# Altium PCB PCB1.PcbDoc
Units mm, origin at the board's own origin, x right, y up, seen from the top; angles counter-clockwise.
Board outline 58 x 55 mm, 4 copper layers (TOP01, GND02, PWR03, BOT04), stack 0.603 mm thick; 80 components, 56 nets, 296 pads, 189 vias.
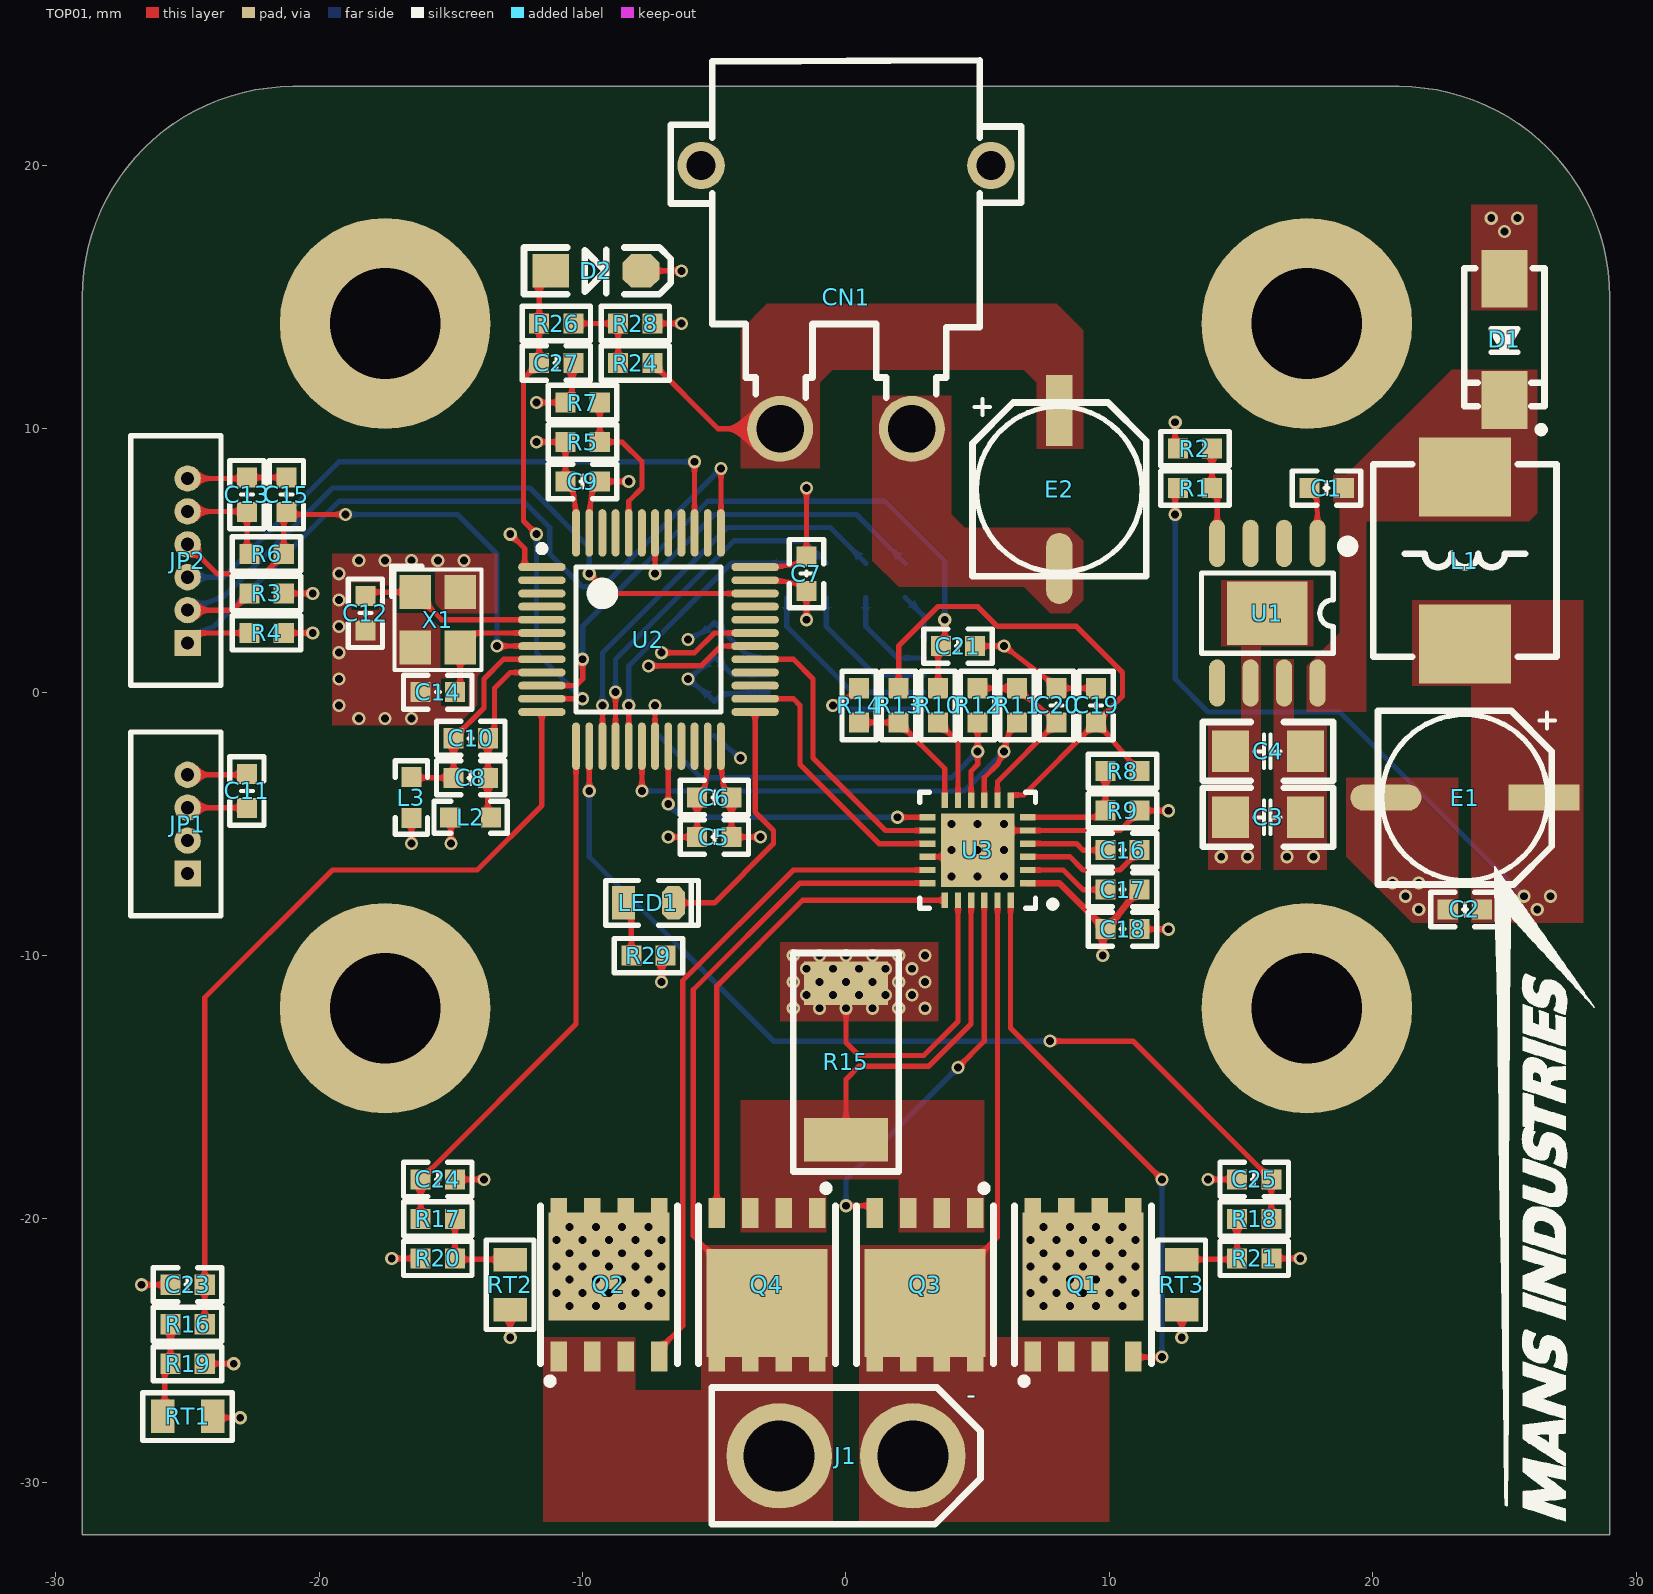
[diagram p0: TOP01 view]
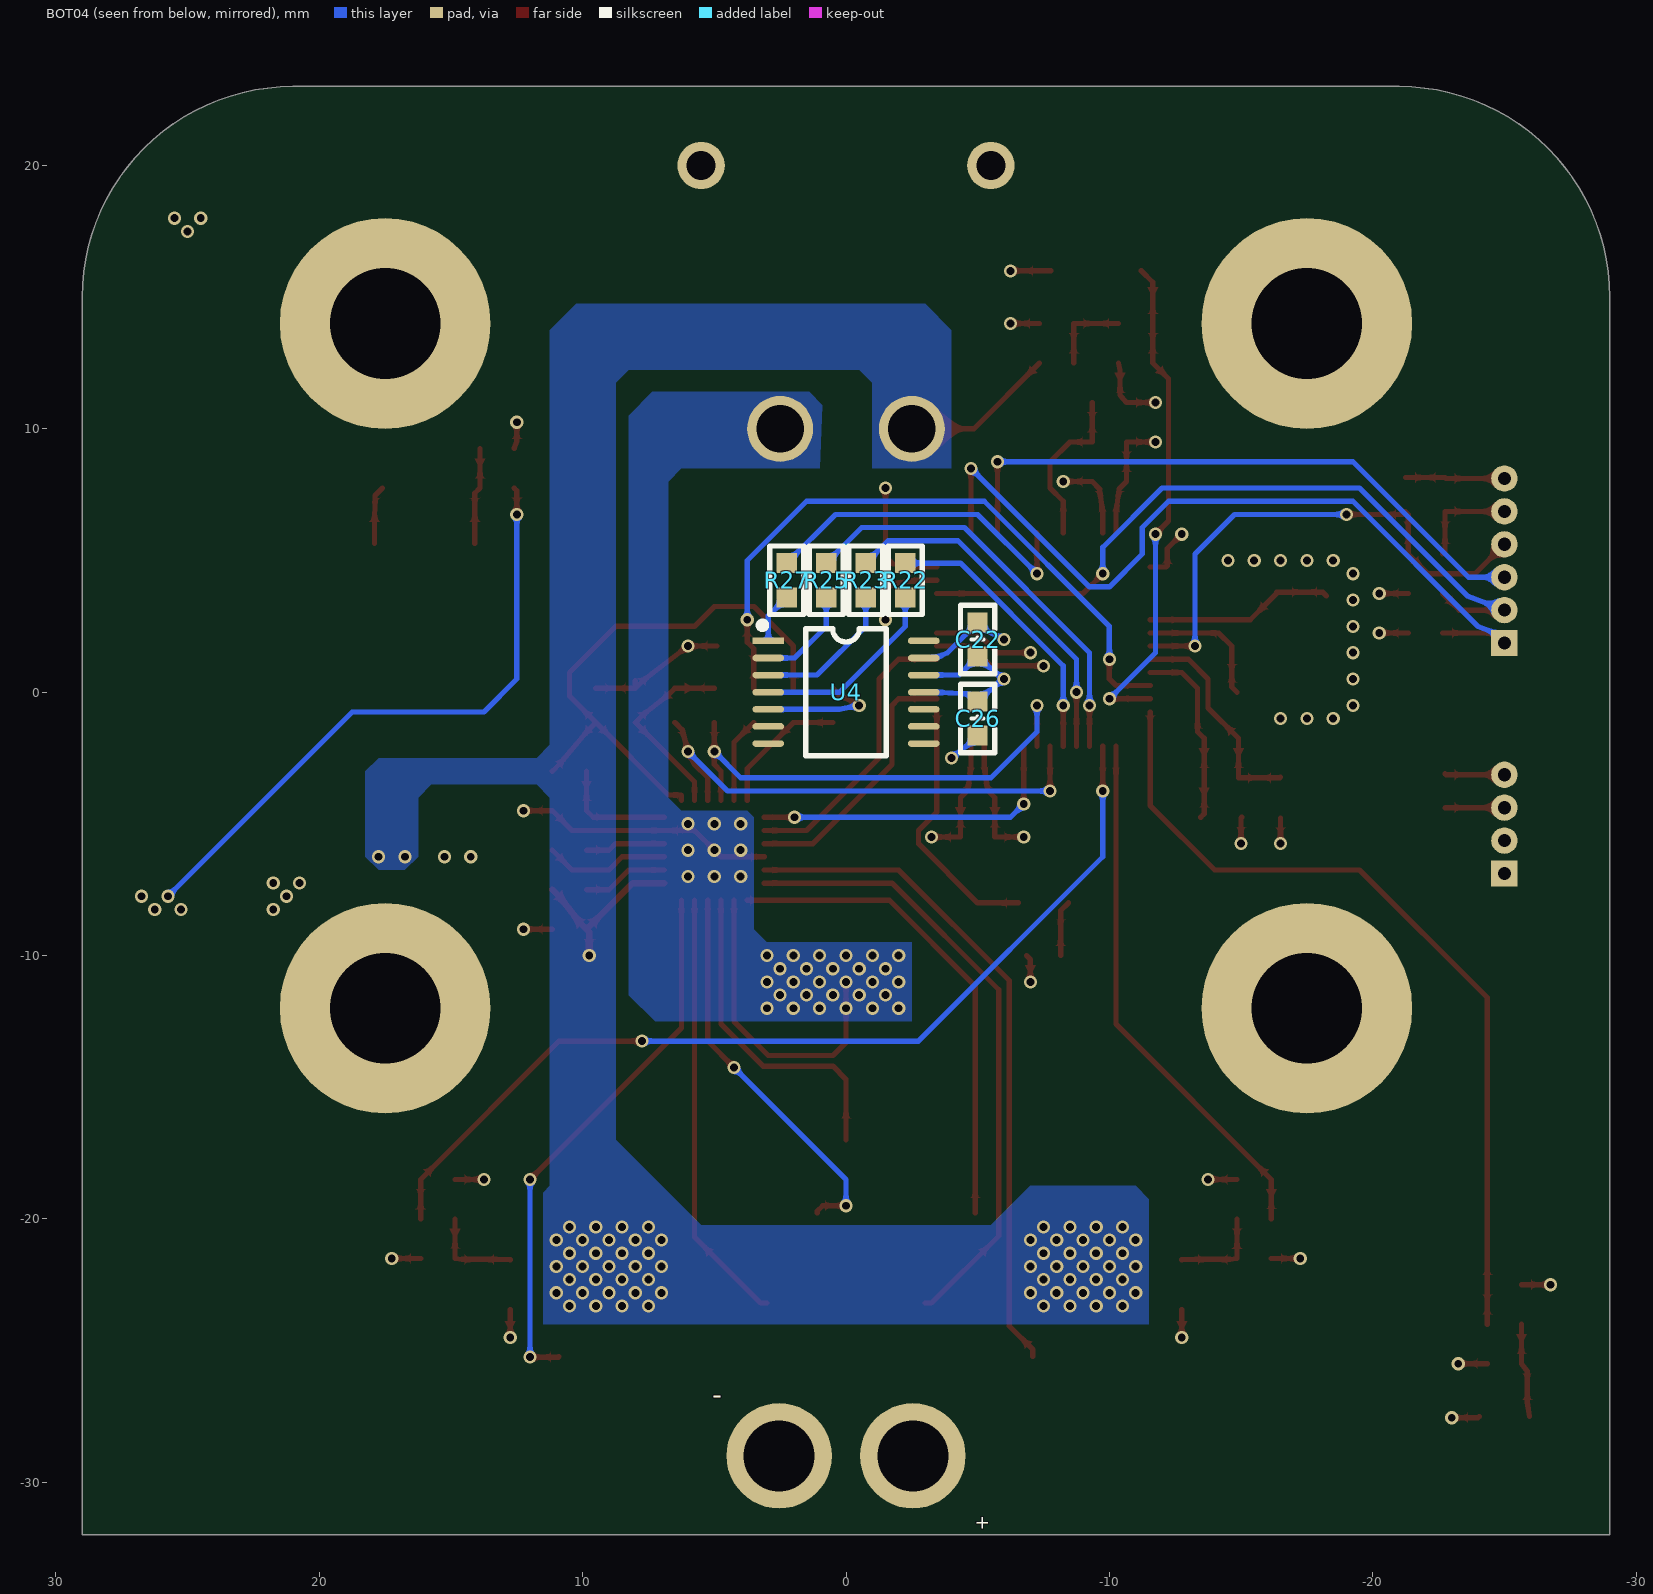
[diagram p1: BOT04 view, seen from below]
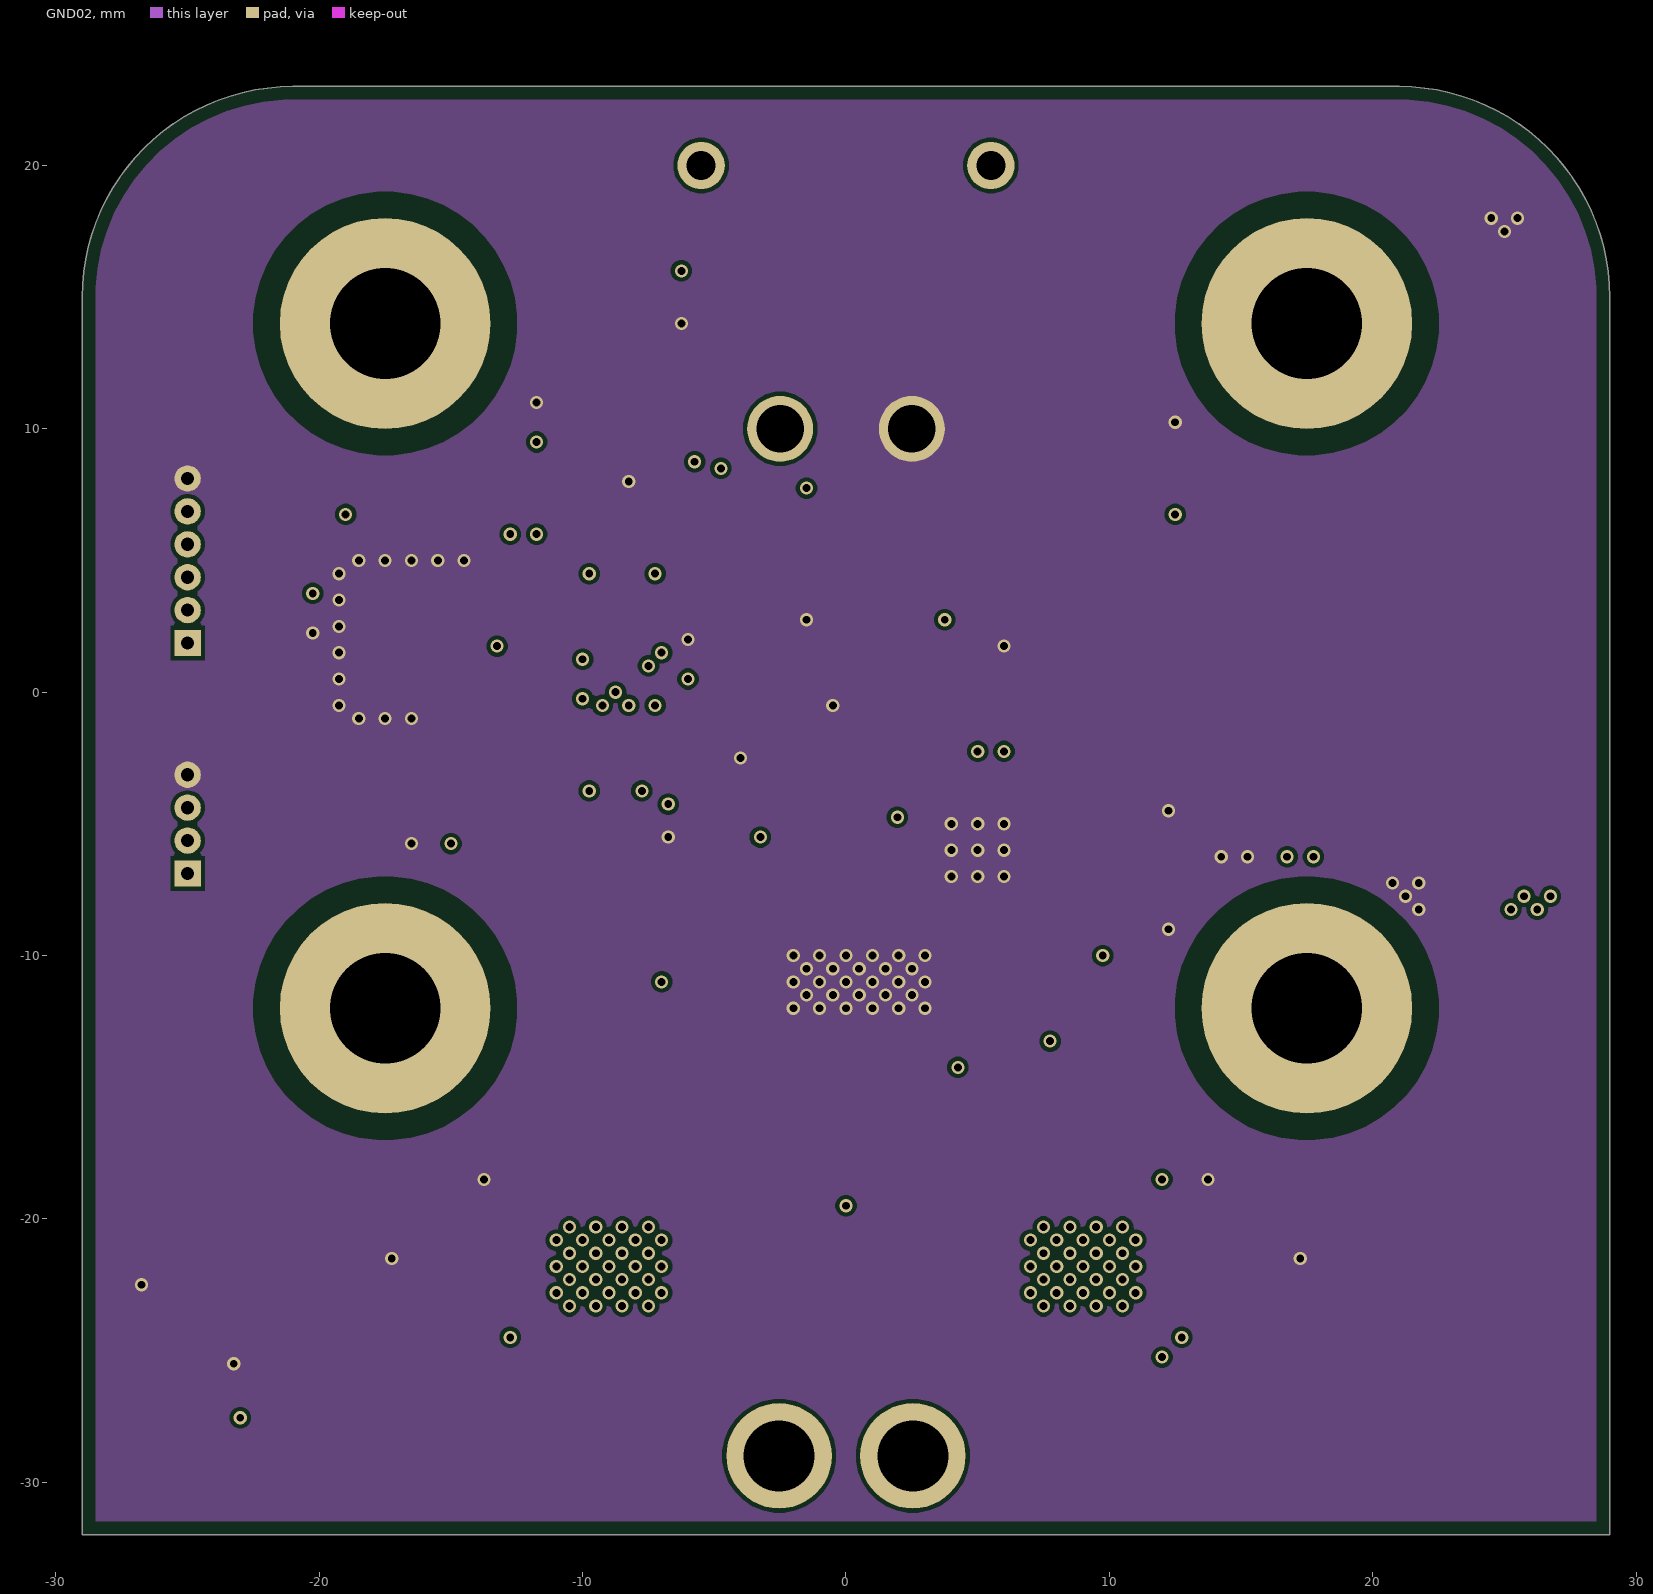
[diagram p2: GND02]
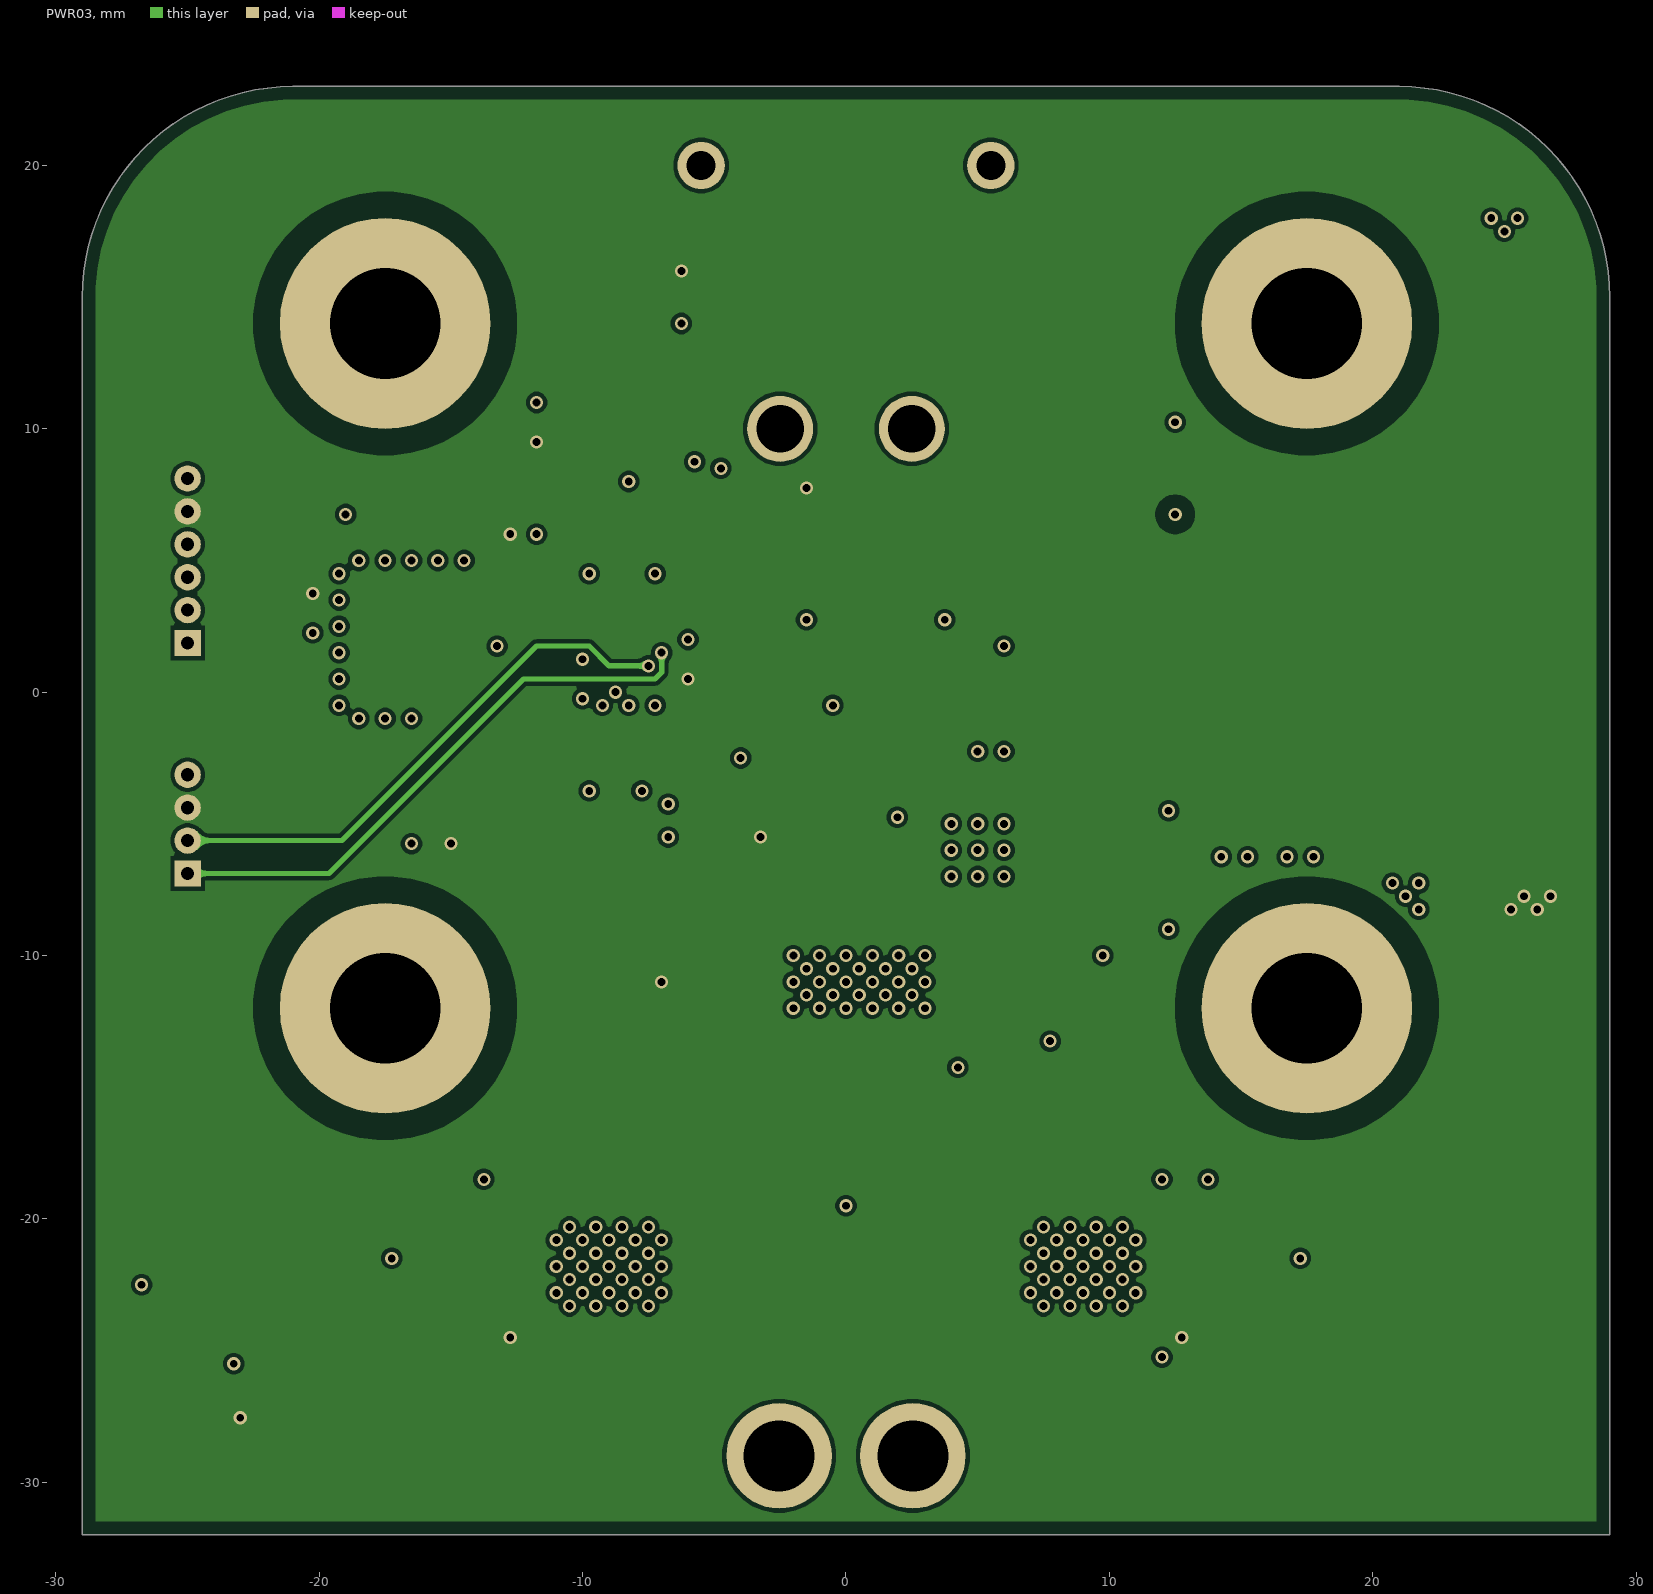
[diagram p3: PWR03]
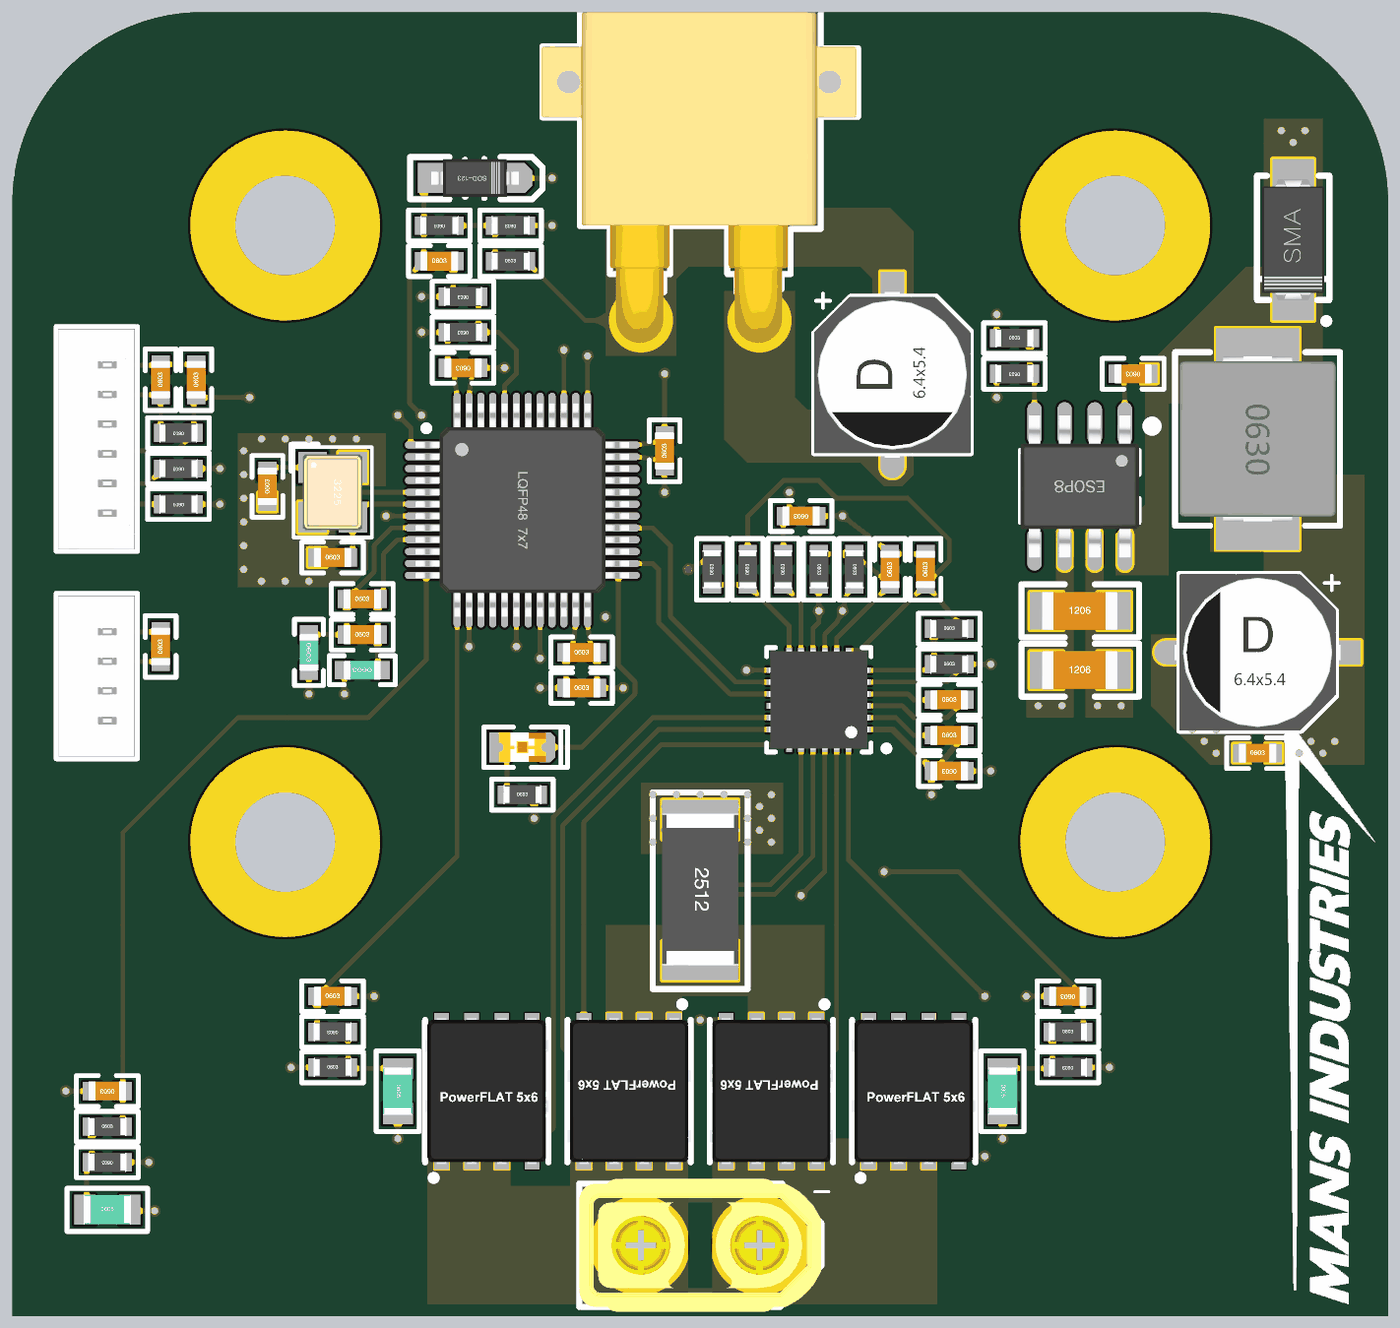
[diagram p4: 3D render of the assembled board from above, using the file's embedded part models]
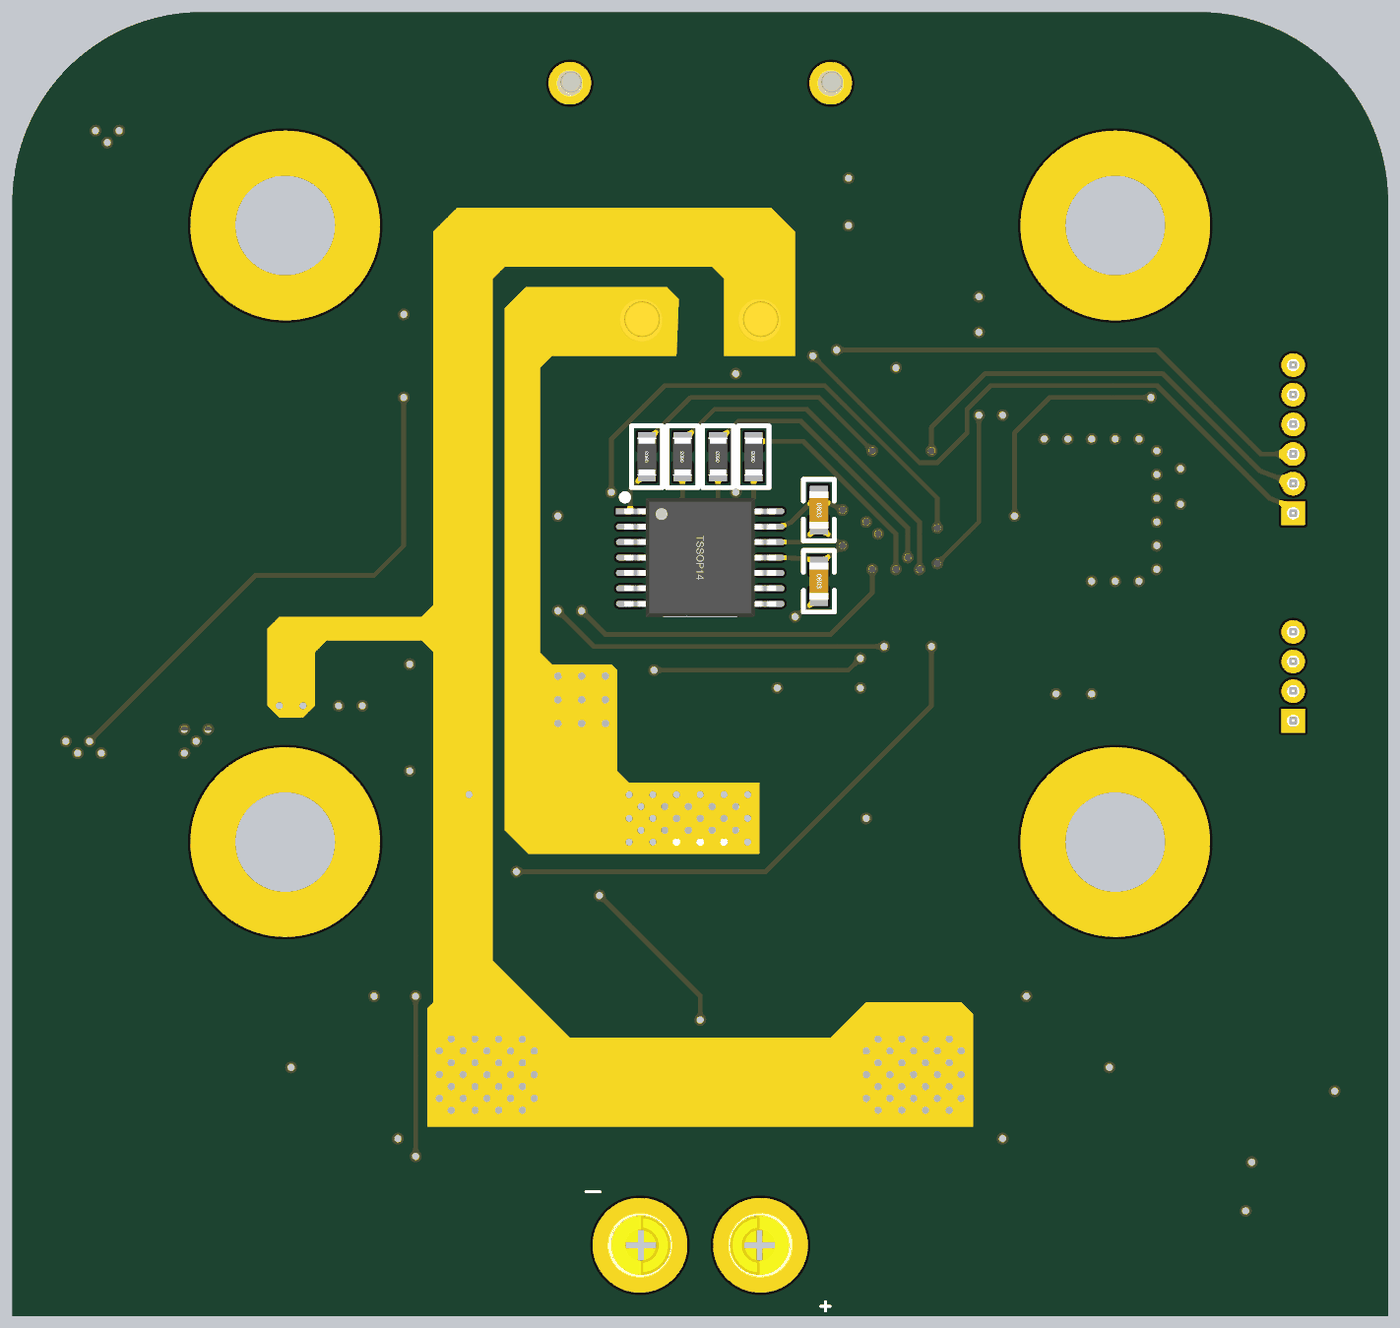
[diagram p5: 3D render of the assembled board from below, using the file's embedded part models]

## Layer stack, top to bottom
Top Solder: solder mask 0.0102, Solder Resist, Dk 3.5
TOP01: signal copper 0.0356
Dielectric 2: prepreg 0.0711, PP-006, Dk 4.1
GND02: signal copper 0.035
Dielectric 1: dielectric 0.32, FR-4, Dk 4.8
PWR03: signal copper 0.035
Dielectric 3: prepreg 0.0711, PP-006, Dk 4.1
BOT04: signal copper 0.0356
Bottom Solder: solder mask 0.0102, Solder Resist, Dk 3.5

## Board outline
-29,-32 -29,15 cw(c-21,15) -21,23 21,23 cw(c21,15) 29,15 29,-32

## Design rules (kind name [scope] priority, off if disabled: settings)
BoardOutlineClearance [All] p1: gap=0.5 ignorepadtopadclearanceinfootprint=FALSE except(0: Arc-SplitContinuation Track-SplitContinuation SMDPad-SplitContinuation THPad-SplitContinuation Via-SplitContinuation Fill-SplitContinuation Poly-SplitContinuation Region-SplitContinuation Text-SplitContinuation)
Clearance [All] p1: gap=0.15 ignorepadtopadclearanceinfootprint=FALSE
PolygonConnect [All] p1: connectstyle=Direct reliefconductorwidth=0.254 reliefentries=4 polygonreliefangle="90 Angle" airgapwidth=0.254
RoutingVias [All] p1: holewidth=0.711 width=1.27 viastyle="Through Hole" minholewidth=0.711 minwidth=1.27 maxholewidth=0.711 maxwidth=1.27
SolderMaskExpansion [All] p1: expansion=0.102 istentingtop=FALSE
SupplyNets "Schematic Supply Nets_6" [InNet('SN')] p1: voltage=0.000
SupplyNets "Schematic Supply Nets_4" [InNet('VBAT')] p2: voltage=0.000
SupplyNets "Schematic Supply Nets_3" [InNet('AGND')] p3: voltage=0.000
SupplyNets "Schematic Supply Nets_2" [InNet('AVDD')] p4: voltage=0.000
SupplyNets "Schematic Supply Nets_1" [InNet('VIN')] p5: voltage=0.000
SupplyNets "Schematic Supply Nets" [InNet('DVDD')] p6: voltage=0.000
Width [All] p1: maxlimit=5 minlimit=0.15 preferedwidth=0.2 minimp=50.000000 maximp=50.000000 favimp=50.000000
30 further rules are at their usual default settings.

## Classes and differential pairs
component class "04 Sensing": C22 C23 C24 C25 C26 C27 D2 R16 R17 R18 R19 R20 R21 R22 R23 R24 R25 R26 R27 R28 RT1 RT2 RT3 U4
component class "03 DRV": C16 C17 C18 C19 C20 C21 E2 J1 Q1 Q2 Q3 Q4 R8 R9 R10 R11 R12 R13 R14 R15 U3
component class "02 MCU": C5 C6 C7 C8 C9 C10 C11 C12 C13 C14 C15 JP1 JP2 L2 L3 LED1 R3 R4 R5 R6 R7 R29 U2 X1
component class "01 POW": C1 C2 C3 C4 CN1 D1 E1 L1 R1 R2 U1

## Components (designator, comment, footprint, x,y, rotation, side; value= is the part's Value field where it differs from the comment)
C1 "10nF/50V" C0603_L 18.25,7.75 r180 top
C2 "100nF/50V" C0603_L 23.5,-8.25 r0 top
C3 "4.7uF/50V" C1206_L 16,-4.75 r0 top
C4 "4.7uF/50V" C1206_L 16,-2.25 r0 top
C5 "4.7uF/16V" C0603_L -5,-5.5 r0 top
C6 "100nF/50V" C0603_L -5,-4 r0 top
C7 "100nF/50V" C0603_L -1.5,4.5 r90 top
C8 "1uF/50V" C0603_L -14.25,-3.25 r0 top
C9 "100nF/50V" C0603_L -10,8 r180 top
C10 "10nF/50V" C0603_L -14.25,-1.75 r0 top
C11 "100nF/50V" C0603_L -22.75,-3.75 r90 top
C12 "10pF/50V" C0603_L -18.25,3 r90 top
C13 "100nF/50V" C0603_L -22.75,7.5 r90 top
C14 "10pF/50V" C0603_L -15.5,0 r0 top
C15 "100nF/50V" C0603_L -21.25,7.5 r90 top
C16 "100nF/50V" C0603_L 10.5,-6 r0 top
C17 "1uF/50V" C0603_L 10.5,-7.5 r0 top
C18 "100nF/50V" C0603_L 10.5,-9 r180 top
C19 "1uF/50V" C0603_L 9.5,-0.5 r90 top
C20 "1uF/50V" C0603_L 8,-0.5 r90 top
C21 "100nF/50V" C0603_L 4.25,1.75 r180 top
C22 "1uF/50V" C0603_L -5,2 r270 bottom
C23 "100nF/50V" C0603_L -25,-22.5 r180 top
C24 "100nF/50V" C0603_L -15.5,-18.5 r0 top
C25 "100nF/50V" C0603_L 15.5,-18.5 r180 top
C26 "100nF/50V" C0603_L -5,-1 r270 bottom
C27 "100nF/50V" C0603_L -11,12.5 r0 top
CN1 "XT30PW-M30.G.Y" XT30PW-M 0,15 r180 top
D1 "SS210" SMA 25,13.4 r270 top
D2 "B5819W SL" SOD-123 -9.5,16 r0 top
E1 "330uF/6.3V" "CE D(6.3*5.4)" 23.5,-4 r0 top
E2 "47uF/50V" "CE D(6.3*5.4)" 8.1,7.7 r90 top
J1 "XT30UPB-M" XT30-M 0,-29 r0 top
JP1 "ZX-MX1.25-4PZZ" MX1.25-LI-4P -25,-5 r90 top
JP2 "ZX-MX1.25-6PZZ" MX1.25-LI-6P -25,5 r90 top
L1 "22uH/2.5A" L-SMD-0630 23.5,5 r270 top
L2 "600Ω@100MHz" L0603 -14.25,-4.75 r180 top
L3 "600Ω@100MHz" L0603 -16.5,-4 r270 top
LED1 "NCD0805R1" LED0805_R -7.5,-8 r0 top
Q1 "HYG015N04LS1C2" PowerFLAT-8(5x6) 9,-22.5 r0 top
Q2 "HYG015N04LS1C2" PowerFLAT-8(5x6) -9,-22.5 r0 top
Q3 "HYG015N04LS1C2" PowerFLAT-8(5x6) 3,-22.5 r180 top
Q4 "HYG015N04LS1C2" PowerFLAT-8(5x6) -3,-22.5 r180 top
R1 "10K/1%" R0603_L 13.25,7.75 r180 top
R2 "5.9K/1%" R0603_L 13.25,9.25 r0 top
R3 "10K/1%" R0603_L -22,3.75 r180 top
R4 "10K/1%" R0603_L -22,2.25 r180 top
R5 "NC" R0603_L -10,9.5 r180 top
R6 "10K/1%" R0603_L -22,5.25 r180 top
R7 "10K/1%" R0603_L -10,11 r180 top
R8 "2K/1%" R0603_L 10.5,-3 r0 top
R9 "3.3K/1%" R0603_L 10.5,-4.5 r0 top
R10 "100/1%" R0603_L 3.5,-0.5 r90 top
R11 "10K/1%" R0603_L 6.5,-0.5 r270 top
R12 "10K/1%" R0603_L 5,-0.5 r270 top
R13 "NC" R0603_L 2,-0.5 r90 top
R14 "200K/1%" R0603_L 0.5,-0.5 r90 top
R15 "5mR/1%" R2512_L 0,-14 r270 top
R16 "100/1%" R0603_L -25,-24 r0 top
R17 "100/1%" R0603_L -15.5,-20 r180 top
R18 "100/1%" R0603_L 15.5,-20 r0 top
R19 "10K/1%" R0603_L -25,-25.5 r180 top
R20 "10K/1%" R0603_L -15.5,-21.5 r0 top
R21 "10K/1%" R0603_L 15.5,-21.5 r180 top
R22 "33/1%" R0603_L -2.25,4.25 r90 bottom
R23 "33/1%" R0603_L -0.75,4.25 r90 bottom
R24 "10K/1%" R0603_L -8,12.5 r0 top
R25 "33/1%" R0603_L 0.75,4.25 r90 bottom
R26 "100/1%" R0603_L -11,14 r180 top
R27 "0/1%" R0603_L 2.25,4.25 r90 bottom
R28 "1K/1%" R0603_L -8,14 r180 top
R29 "3.3K/1%" R0603_L -7.5,-10 r0 top
RT1 "NC" R0805-HP_L -25,-27.5 r0 top
RT2 "10K/3950K" R0805-HP_L -12.75,-22.5 r270 top
RT3 "10K/3950K" R0805-HP_L 12.75,-22.5 r270 top
U1 "TPS5430DDAR" SOIC-8_EP 16,3 r270 top
U2 "STM32F103C8T6" LQFP48_N -7.5,2 r0 top
U3 "DRV8701ERGER" VQFN-24 5,-6 r180 top
U4 "AS5047P" TSSOP14_L 0,0 r180 bottom
X1 "16MHz" XTAL-3225-4P -15.5,2.75 r270 top

## Footprints (in the part's own frame and the unit in brackets; to place one, negate y for a bottom-side part, rotate by r counter-clockwise, add the part's x,y. Pads: shape width x height; smd on the part's side, far side on the other; paste and mask are expansions set on the pad)
C0603_L [mil] "贴片MLCC电容"
  rect 30x30 smd: 1(-25.59,0) 2(25.59,0)
  silkscreen extent -51,-26 51,26, body extent -31,-16 32,16, height 33
C1206_L [mil] "贴片MLCC电容"
  rect 55x62 smd: 1(-55.12,0) 2(57.09,0)
  silkscreen extent -96,-44 98,44, body extent -63,-32 63,32, height 49
"CE D(6.3*5.4)" [mm] "贴片电解电容，直径6.3mm，高5.4mm"
  rect 2.7x1 smd: 1(3,0)
  oval 2.7x1 smd: 2(-3,0)
  silkscreen extent -3.3,-3.3 3.43,3.3, body extent -3.5,-3.3 3.5,3.3, height 5.45
L0603 [mil] "小功率贴片电感"
  rect 30x30 smd: 1(-30.59,0) 2(30.59,0)
  silkscreen extent -55,-24 55,24, body extent -31,-16 32,16, height 31
L-SMD-0630 [mm] "一体化成型电感"
  rect 3x3.5 smd: 1(-3.175,0) 2(3.175,0)
  silkscreen extent -3.66,-3.48 3.66,3.48, body extent -3.47,-3.3 3.48,3.3
LED0805_R [mil] "红色0805LED"
  rect 35x50 smd: 1(-37.41,0)
  oct 35x50 smd: 2(37.4,0)
  silkscreen extent -64,-33 75,33, body extent -39,-25 39,25, height 32
LQFP48_N [mm] "Thin QFP, 48-Leads, Body 7x7mm, Pitch 0.5mm, IPC Medium Density封装库来自淘宝 ID：黄晶宝石"
  oval 1.8x0.3 smd: 1(-4.05,2.75) 2(-4.05,2.25) 3(-4.05,1.75) 4(-4.05,1.25) 5(-4.05,0.75) 6(-4.05,0.25) 7(-4.05,-0.25) 8(-4.05,-0.75) 9(-4.05,-1.25) 10(-4.05,-1.75) 11(-4.05,-2.25) 12(-4.05,-2.75) 25(4.05,-2.75) 26(4.05,-2.25) 27(4.05,-1.75) 28(4.05,-1.25) 29(4.05,-0.75) 30(4.05,-0.25) 31(4.05,0.25) 32(4.05,0.75) 33(4.05,1.25) 34(4.05,1.75) 35(4.05,2.25) 36(4.05,2.75)
  oval 0.3x1.8 smd: 13(-2.75,-4.05) 14(-2.25,-4.05) 15(-1.75,-4.05) 16(-1.25,-4.05) 17(-0.75,-4.05) 18(-0.25,-4.05) 19(0.25,-4.05) 20(0.75,-4.05) 21(1.25,-4.05) 22(1.75,-4.05) 23(2.25,-4.05) 24(2.75,-4.05) 37(2.75,4.05) 38(2.25,4.05) 39(1.75,4.05) 40(1.25,4.05) 41(0.75,4.05) 42(0.25,4.05) 43(-0.25,4.05) 44(-0.75,4.05) 45(-1.25,4.05) 46(-1.75,4.05) 47(-2.25,4.05) 48(-2.75,4.05)
  silkscreen extent -4.17,-2.75 2.75,3.57, body extent -4.5,-4.5 4.5,4.5, height 1.45
MX1.25-LI-4P [mm] "长：6.75mm，宽：3.2mm，高：4.2mm"
  rect 1x1 hole 0.5: 1(-1.885,0)
  round 1 hole 0.5: 2(-0.635,0) 3(0.615,0) 4(1.865,0)
  silkscreen extent -3.49,-1.27 3.49,2.16, body extent -3.38,-1.15 3.37,2.05, height 4.25
MX1.25-LI-6P [mm] "长：9.25mm，宽：3.2mm，高：4.2mm            淘宝ID:黄晶宝石"
  rect 1x1 hole 0.5: 1(-3.135,0)
  round 1 hole 0.5: 2(-1.885,0) 3(-0.635,0) 4(0.615,0) 5(1.865,0) 6(3.115,0)
  silkscreen extent -4.74,-1.27 4.74,2.16, body extent -4.63,-1.15 4.62,2.05, height 4.25
PowerFLAT-8(5x6) [mm]
  rect 0.62x1.15 smd paste-100 mask+0.051: 1(-1.905,-2.726) 2(-0.635,-2.726) 3(0.635,-2.726) 4(1.905,-2.726) 5(1.905,2.727) 6(0.635,2.727) 7(-0.635,2.727) 8(-1.905,2.727)
  rect 4.6x4.1 smd paste-100 mask+0.051: 8(0,0.693)
  silkscreen extent -2.6,-3.79 2.6,3, body extent -2.6,-3.07 2.6,3.08, height 0.95
R0603_L [mil] "1/10W贴片电阻"
  rect 30x30 smd: 1(-25.59,0) 2(25.59,0)
  silkscreen extent -51,-26 51,26, body extent -31,-16 32,16, height 16
R0805-HP_L [mm] "1/8W高精度贴片电阻"
  rect 0.889x1.27 smd: 1(-0.95,0) 2(0.95,0)
  silkscreen extent -1.7,-0.91 1.7,0.9, body extent -1,-0.62 1,0.63, height 0.5
R2512_L [mm] "1W贴片电阻                淘宝ID:黄晶宝石"
  rect 1.65x3.2 smd: 1(-2.95,0) 2(3,0)
  silkscreen extent -4.1,-2 4.2,2, body extent -3.2,-1.6 3.2,1.6, height 0.55
SMA [mm] "4.5x2.6*2.2mm（长宽高，不包括引脚）"
  rect 2.2x1.75 smd: 1(-2.3,0) 2(2.3,0)
  silkscreen extent -2.7,-1.52 3.56,1.52, body extent -2.55,-1.3 2.55,1.3, height 2.15
SOD-123 [mil] "2.7x1.6X1.1mm（长宽高，不包括引脚） 淘宝ID:黄晶宝石"
  rect 55x50 smd: 1(-67.5,0)
  oct 55x50 smd: 2(67.5,0)
  silkscreen extent -108,-35 112,35, body extent -73,-32 73,31, height 50
SOIC-8_EP [mm] "5*6*1.8mm（长宽高"
  oval 1.8x0.61 smd: 1(-2.65,1.905) 2(-2.65,0.635) 3(-2.65,-0.635) 4(-2.65,-1.905) 5(2.65,-1.905) 6(2.65,-0.635) 7(2.65,0.635) 8(2.65,1.905)
  rect 2.413x3.048 smd paste-2: 9(0,0)
  rect 0.9x0.7 on Top Paste: 10(-0.625,1.1) 10(-0.625,0) 10(-0.625,-1.1) 11(0.65,0) 11(0.65,1.1) 11(0.65,-1.1)
  silkscreen extent -2.69,-2.5 1.52,3.2, body extent -3,-2.5 3,2.5, height 1.53
TSSOP14_L [mm] "5*6.4*1mm（长宽高）"
  rect 1.2x0.25 smd: 1(-2.95,1.95)
  oval 1.2x0.25 smd: 2(-2.95,1.3) 3(-2.95,0.65) 4(-2.95,0) 5(-2.95,-0.65) 6(-2.95,-1.3) 7(-2.95,-1.95) 8(2.95,-1.95) 9(2.95,-1.3) 10(2.95,-0.65) 11(2.95,0) 12(2.95,0.65) 13(2.95,1.3) 14(2.95,1.95)
  silkscreen extent -3.3,-2.41 1.52,2.67, body extent -3.2,-2.5 3.2,2.5, height 1.03
VQFN-24 [mm] "QFN, 24-Leads, Body 4.00x4.00mm, Pitch 0.50mm, Thermal Pad 2.80x2.80mm, IPC Medium Density"
  rect 0.6x0.24 smd: 1(-1.9,1.25) 2(-1.9,0.75) 3(-1.9,0.25) 4(-1.9,-0.25) 5(-1.9,-0.75) 6(-1.9,-1.25) 13(1.9,-1.25) 14(1.9,-0.75) 15(1.9,-0.25) 16(1.9,0.25) 17(1.9,0.75) 18(1.9,1.25)
  rect 0.24x0.6 smd: 7(-1.25,-1.9) 8(-0.75,-1.9) 9(-0.25,-1.9) 10(0.25,-1.9) 11(0.75,-1.9) 12(1.25,-1.9) 19(1.25,1.9) 20(0.75,1.9) 21(0.25,1.9) 22(-0.25,1.9) 23(-0.75,1.9) 24(-1.25,1.9)
  rect 2.8x2.8 smd: 25(0,0)
  silkscreen extent -2.98,-2.2 2.2,2.2, body extent -2.1,-2.1 2.1,2.1, height 1
XT30-M [mm]
  round 4 hole 2.7: 1(-2.54,0) 2(2.54,0)
  silkscreen extent -5.1,-2.6 5.11,2.6, body extent -5.1,-2.8 5.1,2.8, height 10.66
XT30PW-M [mm]
  round 2.5 hole 1.8: 1(-2.5,5) 2(2.5,5)
  round 1.8 hole 1.1: 3(5.5,-5) 4(-5.5,-5)
  silkscreen extent -6.65,-9 6.65,3.81, body extent -6.6,-8 6.7,5.95, height 5
XTAL-3225-4P [mm] "3.2*2.5*0.7mm(长宽高)                             淘宝ID:黄晶宝石"
  rect 1.3x1.2 smd: 1(-1.05,-0.85) 2(1.05,-0.85) 3(1.05,0.85) 4(-1.05,0.85)
  silkscreen extent -2.03,-1.75 1.91,1.65, body extent -1.6,-1.25 1.6,1.25, height 0.7

## Part data
C1 C10: library part C, "0603B103K500NT", BOM名称=无极性贴片电容, 联系卖家，免费查找封装=唯一出售店铺网址https://shop463601444.taobao.com
C2 C6 C7 C9 C11 C13 C15 C16 C18 C21 C23 C24 C25 C26 C27: library part C, "CC0603KRX7R9BB104", BOM名称=无极性贴片电容, 联系卖家，免费查找封装=唯一出售店铺网址https://shop463601444.taobao.com
C3 C4: library part C, "1206B475K500NT", BOM名称=无极性贴片电容, 联系卖家，免费查找封装=唯一出售店铺网址https://shop463601444.taobao.com
C5: library part C, "CL10A475KO8NNNC", BOM名称=无极性贴片电容, 联系卖家，免费查找封装=唯一出售店铺网址https://shop463601444.taobao.com
C8 C17 C19 C20 C22: library part C, "CL10A105KB8NNNC", BOM名称=无极性贴片电容, 联系卖家，免费查找封装=唯一出售店铺网址https://shop463601444.taobao.com
C12 C14: library part C, "CL10C100JB8NNNC", BOM名称=无极性贴片电容, 联系卖家，免费查找封装=唯一出售店铺网址https://shop463601444.taobao.com
CN1: library part XT30PW-M, BOM_JLCPCB Part Class="Extended Part", BOM_Manufacturer="Changzhou Amass Elec", BOM_Manufacturer Part=XT30PW-M, BOM_Supplier=LCSC, BOM_Supplier Part=C431092, Contributor=LCSC, spicePre=C, spiceSymbolName=XT30PW-M
D1: library part SS14, BOM名称=肖特基二极管, 属性=40V/1A, 联系卖家，免费查找封装=唯一出售店铺网址https://shop463601444.taobao.com
D2: library part 1N4007, BOM名称=整流二极管, 联系卖家，免费查找封装=唯一出售店铺网址https://shop463601444.taobao.com
E1: library part CE_SMD, "RVT0J331M0605", BOM名称=贴片电解电容, 联系卖家，免费查找封装=唯一出售店铺网址https://shop463601444.taobao.com
E2: library part CE_SMD, "RV50V47M6X5", BOM名称=贴片电解电容, 联系卖家，免费查找封装=唯一出售店铺网址https://shop463601444.taobao.com
J1: library part XT-60
JP1: library part "Header 4", BOM名称=4P连接器, 联系卖家 免费技术支持=封装库来自淘宝卖家ID：黄晶宝石, 联系卖家，免费技术支持=唯一出售店铺网址https://shop463601444.taobao.com
JP2: library part "Header 6", BOM名称=6P连接器, 联系卖家 免费技术支持=封装库来自淘宝卖家ID：黄晶宝石, 联系卖家，免费技术支持=唯一出售店铺网址https://shop463601444.taobao.com
L1: library part "L-Molding Choke", "FXL0630-220-M", BOM名称=一体成型电感, 联系卖家，免费查找封装=唯一出售店铺网址https://shop463601444.taobao.com
L2 L3: library part L, "GZ1608D601TF", BOM名称=小功率贴片电感, 联系卖家，免费查找封装=唯一出售店铺网址https://shop463601444.taobao.com
LED1: library part LED-SMD, BOM名称=贴片LED, 联系卖家 免费查找封装=封装库来自淘宝卖家ID：黄晶宝石
Q1 Q2 Q3 Q4: library part STL90N10F7
R1 R3 R4 R5 R6 R7 R11 R12 R19 R20 R21 R24: library part R, "0603WAF1002T5E", BOM名称=贴片电阻, 联系卖家，免费查找封装=唯一出售店铺网址https://shop463601444.taobao.com
R2: library part R, "0603WAF5901T5E", BOM名称=贴片电阻, 联系卖家，免费查找封装=唯一出售店铺网址https://shop463601444.taobao.com
R8: library part R, "0603WAF2001T5E", BOM名称=贴片电阻, 联系卖家，免费查找封装=唯一出售店铺网址https://shop463601444.taobao.com
R9 R29: library part R, "0603WAF3301T5E", BOM名称=贴片电阻, 联系卖家，免费查找封装=唯一出售店铺网址https://shop463601444.taobao.com
R10 R16 R17 R18 R26: library part R, "0603WAF1000T5E", BOM名称=贴片电阻, 联系卖家，免费查找封装=唯一出售店铺网址https://shop463601444.taobao.com
R13: library part R, "0603WAF6802T5E", BOM名称=贴片电阻, 联系卖家，免费查找封装=唯一出售店铺网址https://shop463601444.taobao.com
R14: library part R, "0603WAF2003T5E", BOM名称=贴片电阻, 联系卖家，免费查找封装=唯一出售店铺网址https://shop463601444.taobao.com
R15: library part R, "HoJLR2512-3W-5mR-1%", BOM名称=贴片电阻, 联系卖家，免费查找封装=唯一出售店铺网址https://shop463601444.taobao.com
R22 R23 R25: library part R, "0603WAF330JT5E", BOM名称=贴片电阻, 联系卖家，免费查找封装=唯一出售店铺网址https://shop463601444.taobao.com
R27: library part R, "0603WAF0000T5E", BOM名称=贴片电阻, 联系卖家，免费查找封装=唯一出售店铺网址https://shop463601444.taobao.com
R28: library part R, "0603WAF1001T5E", BOM名称=贴片电阻, 联系卖家，免费查找封装=唯一出售店铺网址https://shop463601444.taobao.com
RT1: library part RT, "MF52D 103F3435-100", BOM名称=压敏电阻, 联系卖家，免费查找封装=唯一出售店铺网址https://shop463601444.taobao.com
RT2 RT3: library part RT, "SDNT2012X103F3950FTF", BOM名称=压敏电阻, 联系卖家，免费查找封装=唯一出售店铺网址https://shop463601444.taobao.com
U2: "STM32 ARM-based 32-bit MCU Performance Line with 64 kB Flash, 20 kB Internal RAM, -40 to +85癈 Temperature, 48-Pin LQFP, Tray", ComponentLink1Description="Manufacturer URL", ComponentLink1URL=http://www.st.com/, ComponentLink2Description="STM32F103 Datasheet", ComponentLink2URL=http://www.st.com/internet/com/TECHNICAL_RESOURCES/TECHNICAL_LITERATURE/DATASHEET/CD00161566.pdf, ComponentLink3Description="STM32 Family Web Page", ComponentLink3URL=www.st.com/stm32, DatasheetVersion="rev13.0, Apr-2011", PackageDescription="48-Pin Low-Profile Quad Flat Pack, 7 x 7 mm Body, 0.5 mm Pitch (LQFP48)", PackageReference=LQFP48, PackageVersion="rev13, Apr-2011", 联系卖家，免费查找封装=唯一出售店铺网址https://shop463601444.taobao.com
U3: "DRV8701 DRV8701 H 桥栅极驱动器"
U4: "14 Bit编码器"
X1: library part XTAL-4P, "X322516MLB4SI", BOM名称=4脚无源晶振(谐振器）, 联系卖家，免费查找封装=唯一出售店铺网址https://shop463601444.taobao.com

## Free pads (board coordinates)
  round 8 hole 4.2: M4(-17.5,-12) M4(-17.5,14) M4(17.5,-12) M4(17.5,14)

## Via types
v1: diameter 0.5, hole 0.3, TOP01 to BOT04, tented both sides, 180 vias
v2: diameter 0.508, hole 0.305, TOP01 to BOT04, tented both sides, 9 vias

## Nets (pads, with @x,y where several pads share a name; then routed paths per layer and width w, separated by ;. In a path a pad name is that pad's centre, name@x,y a point inside that pad or via, vN(x,y) a via of type N, cw(c..) or ccw(c..) an arc to the next point about the centre after c; other vN are vias at no path point)
ADC1_IN0: C21.2 R10.2 U2.10 | length 25.3
  TOP01 w0.2: U2.10 -10.25,0.25 -10,0.5 v1(-10,1.25) ; R10.2 3.5,1.65 C21.2 3.75,1.9 v1(3.75,2.75)
  BOT04 w0.2: v1(-10,1.25) -10,2.5 -5.25,7.25 1.5,7.25 3.75,5 v1(3.75,2.75)
ADC2_IN1: C27.1 D2.1 R26.2 U2.11 | length 19.2
  TOP01 w0.2: v1(-11.75,6) -12.25,6.5 -12.25,11.9 C27.1 R26.2 ; R26.2 -11.65,15.565 D2.1 ; U2.11 v1(-10,-0.25)
  BOT04 w0.2: v1(-11.75,6) -11.75,1.5 v1(-10,-0.25)
ADC2_IN2: C23.1 R16.2 U2.12 | length 31.8
  TOP01 w0.2: R16.2 -24.35,-23.719 -24.35,-22.781 C23.1 -24.35,-11.6 -19.5,-6.75 -14,-6.75 -11.55,-4.3 U2.12
ADC2_IN3: C24.1 R17.2 U2.13 | length 20.4
  TOP01 w0.2: R17.2 -16.15,-19.719 -16.15,-18.781 C24.1 -10.25,-12.6 U2.13
ADC2_IN4: C25.1 R18.2 U2.14 | length 36.7
  TOP01 w0.2: v1(-9.75,-3.75) U2.14 ; v1(7.75,-13.25) 10.9,-13.25 C25.1 16.15,-18.781 16.15,-19.719 R18.2
  BOT04 w0.2: v1(-9.75,-3.75) -9.75,-6.25 -2.75,-13.25 v1(7.75,-13.25)
AGND: C8.1 C10.1 L3.1 U2.8 | length 8.3
  TOP01 w0.2: L3.1 -16.473,-3.25 C8.1 C10.1 -13.75,-0.6 -13.75,0.5 -13,1.25 U2.8
AVDD: C19.1 R8.2 R13.2 U3.7 | length 21.1
  TOP01 w0.2: R13.2 2,1.75 3.5,3.25 5,3.25 5.75,2.5 8.75,2.5 10.5,0.75 10.5,-0.15 C19.1 ; U3.7 6.25,-3.92 6.27,-3.9 6.75,-3.9 C19.1 ; R8.2 10.869,-2.719 9.781,-1.431 C19.1
BOOT0: R5.1 R7.1 U2.44 | length 6.3
  TOP01 w0.2: R7.1 R5.1 -8.5,9.5 -7.75,8.75 -7.75,7.75 -8.25,7.25 U2.44
CPH: C16.2 U3.3 | length 4.8
  TOP01 w0.2: U3.3 8.5,-6.25 9,-6.75 10.4,-6.75 C16.2
CPL: C16.1 U3.4 | length 3.1
  TOP01 w0.2: U3.4 8.75,-5.75 9,-6 C16.1
DVDD: C20.1 R11.1 R12.1 U3.8 | length 7.4
  TOP01 w0.2: R12.1 R11.1 6.781,-0.131 7.719,-0.869 C20.1 5.75,-3.4 U3.8
EN: U2.29 U3.14 | length 11
  TOP01 w0.2: U2.29 -2,1.25 -1.25,0.5 -1.25,-2.5 1.5,-5.25 U3.14
Encoder_CS: R27.1 U4.1 | length 1.9
  BOT04 w0.2: R27.1 2.95,2.9 U4.1
Encoder_MISO: R23.1 U4.3 | length 5.6
  BOT04 w0.2: R23.1 -0.75,2.5 1.1,0.65 U4.3
Encoder_MOSI: R22.1 U4.4 | length 7.3
  BOT04 w0.2: R22.1 -2.25,2.5 0.25,0 U4.4
Encoder_SCK: R25.1 U4.2 | length 3.8
  BOT04 w0.2: R25.1 0.75,2.5 1.95,1.3 U4.2
GH1: Q2.4 U3.17 | length 25.7
  TOP01 w0.2: Q2.4 -7.095,-24.961 -6.2,-24.066 -6.2,-10.95 -2,-6.75 U3.17
GH2: Q1.4 U3.24 | length 20.8
  TOP01 w0.2: U3.24 6.25,-12.75 v1(12,-18.5) ; Q1.4 10.929,-25.25 v1(12,-25.25)
  BOT04 w0.2: v1(12,-25.25) v1(12,-18.5)
GL1: Q4.4 U3.19 | length 18.6
  TOP01 w0.2: Q4.4 -4.905,-11.155 -1.65,-7.9 U3.19
GL2: Q3.4 U3.22 | length 15
  TOP01 w0.2: v1(0,-19.5) 0.885,-19.5 1.095,-19.71 Q3.4 ; v1(4.25,-14.25) 5.25,-13.25 U3.22
  BOT04 w0.2: v1(0,-19.5) 0,-18.5 v1(4.25,-14.25)
IDRIVE: R13.1 R14.1 U3.12 | length 5.2
  TOP01 w0.2: R14.1 R13.1 3.75,-2.9 U3.12
LED: LED1.2 U2.25 | length 10
  TOP01 w0.2: LED1.2 -5,-8 -2.75,-5.75 -2.75,-5.25 -3.45,-4.55 U2.25
NetC1_1: C1.1 D1.2 L1.1 U1.8
NetC1_2: C1.2 U1.1 | length 2.2
  TOP01 w0.2: C1.2 17.881,7.469 17.905,6.245 U1.1
NetLED1_1: LED1.1 R29.1 | length 2.1
  TOP01 w0.2: LED1.1 -8.15,-8.3 R29.1
NetR1_1: R1.1 R2.2 U1.4 | length 3.7
  TOP01 w0.2: R2.2 R1.1 14.095,7.555 U1.4
NetR10_1: R10.1 U3.11 | length 3.3
  TOP01 w0.2: R10.1 4.25,-1.9 U3.11
NetR16_1: R16.1 R19.2 RT1.1 | length 3.6
  TOP01 w0.2: RT1.1 -25.87,-26.965 -25.87,-25.781 R19.2 -25.65,-25.219 -25.65,-24.281 R16.1
NetR17_1: R17.1 R20.2 RT2.1 | length 3.6
  TOP01 w0.2: R17.1 -14.85,-20.281 -14.85,-21.219 R20.2 -14.569,-21.537 -13.285,-21.537 RT2.1
NetR18_1: R18.1 R21.2 RT3.1 | length 3.6
  TOP01 w0.2: RT3.1 13.285,-21.537 14.569,-21.537 R21.2 14.85,-21.219 14.85,-20.281 R18.1
NetR24_1: R24.1 R26.1 R28.2 | length 3.2
  TOP01 w0.2: R26.1 R28.2 R24.1
nFAULT: R11.2 U2.18 U3.9 | length 19.4
  TOP01 w0.2: v1(-7.75,-3.75) U2.18 ; U3.9 5.25,-3.25 5.75,-2.75 v1(6,-2.25) 6.219,-1.431 R11.2
  BOT04 w0.2: v1(-7.75,-3.75) 4.5,-3.75 v1(6,-2.25)
NRST: C15.1 JP2.4 R6.1 U2.7 | length 19.9
  TOP01 w0.2: JP2.4 -23.885,4.5 -22.1,4.5 R6.1 -21.35,6.75 C15.1 -21.15,6.75 v1(-19,6.75) ; v1(-13.25,1.75) U2.7
  BOT04 w0.2: v1(-19,6.75) -14.75,6.75 -13.25,5.25 v1(-13.25,1.75)
nSLEEP: U2.20 U3.13 | length 12.3
  TOP01 w0.2: v1(-6.75,-4.25) U2.20 ; v1(1.95,-4.75) U3.13
  BOT04 w0.2: v1(-6.75,-4.25) -6.25,-4.75 v1(1.95,-4.75)
OSC_IN: C12.2 U2.5 X1.1 | length 7.2
  TOP01 w0.2: C12.2 -18.1,3.8 X1.1 -16.35,3.75 -15.35,2.75 U2.5
OSC_OUT: C14.2 U2.6 X1.3 | length 5.1
  TOP01 w0.2: C14.2 -14.65,0.2 X1.3 -14.65,1.75 -14.15,2.25 U2.6
PH: U2.26 U3.15 | length 10.1
  TOP01 w0.2: U2.26 -2,-0.25 -1.75,-0.5 -1.75,-2.75 1.25,-5.75 U3.15
SH1: J1.1 Q2.1 Q2.2 Q2.3 Q4.5 Q4.6 Q4.7 Q4.8 U3.18 | length 23.8
  TOP01 w0.2: Q4.8@-3,-23.193 -3.25,-23.193 -5.8,-20.643 -5.8,-11.3 -1.75,-7.25 U3.18
SH2: J1.2 Q1.1 Q1.2 Q1.3 Q3.5 Q3.6 Q3.7 Q3.8 U3.23 | length 16.6
  TOP01 w0.2: Q3.8@3,-23.193 3.25,-23.193 5.75,-20.693 U3.23
SN: C2.1 C3.1 C4.1 C5.1 C6.1 C7.1 C9.1 C11.2 C12.1 C13.2 C14.1 C15.2 C18.1 C19.2 C20.2 C21.1 C22.1 C23.2 C24.2 C25.2 C26.2 C27.2 CN1.1 D1.1 E1.2 E2.2 JP1.4 JP2.6 L3.2 R2.1 R4.1 R7.2 R9.2 R14.2 R15.1 R19.1 R20.1 R21.1 R28.1 U1.6 U1.9 U2.23 U2.35 U2.47 U3.5 U3.16 U3.20 U3.25 U4.5 U4.13 X1.2 X1.4 | length 68.6
  TOP01 w0.2: v1(-26.75,-22.5) C23.2@-25.65,-22.5 ; JP1.4 -22.785,-3.135 C11.2 ; JP2.6 -22.785,8.115 C13.2 C15.2 ; R19.1 v1(-23.25,-25.5) ; R4.1 v1(-20.25,2.25) ; v1(-17.25,-21.5) R20.1 ; v1(-16.5,-5.75) L3.2 ; C24.2 v1(-13.75,-18.5) ; v1(-11.75,11) -10.931,11 R7.2 -10.406,11.281 -10.406,12.219 C27.2 ; U2.47 -9.75,6.8 -9.631,7.719 C9.1 v1(-8.25,8) ; R28.1 v1(-6.25,14) ; v1(-6.75,-5.5) -5.931,-5.5 C5.1 C6.1 -5.369,-3.719 -5.25,-2.8 U2.23 ; U2.35 -2.7,4.25 -1.781,4.131 C7.1 -1.5,3.569 v1(-1.5,2.75) ; v1(-0.5,-0.5) 0.219,-0.131 R14.2 ; R15.1 0,-13.3 0.5,-13.8 2.95,-13.8 4.25,-12.5 U3.20 ; U3.16 4.75,-6.25 v2(5,-6) 5.75,-5.25 U3.5 10.4,-5.25 R9.2 11.431,-4.5 v1(12.25,-4.5) ; C21.1 5.181,1.75 v1(6,1.75) 7.719,0.431 C20.2 ; C20.2@8,0.431 C20.2 ; C19.2 C20.2 ; C18.1 v1(12.25,-9) ; v1(12.5,10.25) 12.5,9.531 R2.1 ; v1(13.75,-18.5) C25.2 ; R21.1 v1(17.25,-21.5)
  BOT04 w0.2: v1(-6,2) -5.281,2.369 C22.1 -3.85,1.5 -3.425,1.3 U4.13 ; C26.2 -4.719,-1.931 v1(-4,-2.5) ; v1(-0.5,-0.5) 0.25,-0.65 U4.5
  other v1: -2,-12 -1,-12 0,-12 1,-12 2,-12 3,-12 -1.5,-11.5 -0.5,-11.5 0.5,-11.5 1.5,-11.5 2.5,-11.5 -2,-11 -1,-11 0,-11 1,-11 2,-11 3,-11 -1.5,-10.5 -0.5,-10.5 0.5,-10.5 1.5,-10.5 2.5,-10.5 -2,-10 -1,-10 0,-10 1,-10 2,-10 3,-10 21.75,-8.25 21.25,-7.75 20.75,-7.25 21.75,-7.25 14.25,-6.25 15.25,-6.25 -18.5,-1 -17.5,-1 -16.5,-1 -19.25,-0.5 -19.25,0.5 -19.25,1.5 -19.25,2.5 -19.25,3.5 -19.25,4.5 -18.5,5 -17.5,5 -16.5,5 -15.5,5 -14.5,5 25,17.5 24.5,18 25.5,18
  other v2: 4,-7 5,-7 6,-7 4,-6 6,-6 4,-5 5,-5 6,-5
SNSOUT: R12.2 U2.19 U3.10 | length 19
  TOP01 w0.2: U2.19 v1(-7.25,-0.5) ; U3.10 4.75,-3 5,-2.75 v1(5,-2.25) 5,-1.431 R12.2
  BOT04 w0.2: v1(-7.25,-0.5) -7.25,-1.5 -5.5,-3.25 4,-3.25 v1(5,-2.25)
SP: Q3.1 Q3.2 Q3.3 Q4.1 Q4.2 Q4.3 R15.2 U3.21 | length 12.6
  TOP01 w0.2: R15.2 0,-14.7 0.5,-14.2 3.15,-14.2 4.75,-12.6 U3.21
SPI1_CS: R27.2 U2.42 | length 12.7
  TOP01 w0.2: v1(-7.25,4.5) U2.42
  BOT04 w0.2: v1(-7.25,4.5) -5,6.75 0.4,6.75 R27.2
SPI1_MISO: R23.2 U2.16 | length 13.5
  TOP01 w0.2: U2.16 v1(-8.75,0)
  BOT04 w0.2: v1(-8.75,0) -8.75,1.25 -4.25,5.75 -1.6,5.75 R23.2
SPI1_MOSI: R22.2 U2.17 | length 10.7
  TOP01 w0.2: U2.17 v1(-8.25,-0.5)
  BOT04 w0.2: v1(-8.25,-0.5) -8.25,1 -4.35,4.9 R22.2
SPI1_SCK: R25.2 U2.15 | length 16.1
  TOP01 w0.2: U2.15 v1(-9.25,-0.5)
  BOT04 w0.2: v1(-9.25,-0.5) -9.25,1.5 -4.5,6.25 -0.6,6.25 R25.2
SYS_SWCLK: JP2.1 R4.2 U2.37 | length 32.8
  TOP01 w0.2: JP2.1 -24.615,2.25 R4.2 ; U2.37 v1(-4.75,8.5)
  BOT04 w0.2: JP2.1 -24.6,2.265 -24,2.5 -19.25,7.25 ; -17.65,7.25 -19.25,7.25 ; v1(-4.75,8.5) -9.25,4 -10,4 -11.25,5.25 -11.25,6.25 -12.25,7.25 -19.25,7.25
SYS_SWDIO: JP2.2 R3.2 U2.34 | length 28.2
  TOP01 w0.2: JP2.2 -23.285,3.115 R3.2 ; v1(-9.75,4.5) -9,3.75 U2.34
  BOT04 w0.2: JP2.2 -23.593,3.657 -19.5,7.75 -12,7.75 -9.75,5.5 v1(-9.75,4.5)
SYS_SWO: JP2.3 U2.39 | length 23.8
  TOP01 w0.2: U2.39 v1(-5.75,8.75)
  BOT04 w0.2: JP2.3 -23.635,4.365 -19.25,8.75 v1(-5.75,8.75)
USART1_RX: JP1.1 U2.31 | length 25.8
  TOP01 w0.2: v1(-7,1.5) -5.75,1.5 -5,2.25 U2.31
  PWR03 w0.2: JP1.1 -19.635,-6.885 -12.25,0.5 -7.25,0.5 -7,0.75 v1(-7,1.5)
USART1_TX: JP1.2 U2.30 | length 25.2
  TOP01 w0.2: v1(-7.5,1) -5.5,1 -4.75,1.75 U2.30
  PWR03 w0.2: JP1.2 -19.135,-5.635 -11.75,1.75 -9.75,1.75 -9,1 v1(-7.5,1)
VBAT: C2.2 C5.2 C6.2 C7.2 C9.2 C11.1 C13.1 C22.2 C26.1 D2.2 E1.1 JP1.3 JP2.5 L1.2 L2.2 R1.2 R3.1 R5.2 R6.2 R29.2 RT1.2 RT2.2 RT3.2 U2.1 U2.24 U2.36 U2.48 U4.11 U4.12 | length 61.3
  TOP01 w0.2: JP1.3 -22.765,-4.385 C11.1 ; JP2.5 -22.765,6.865 C13.1 -22.75,5.35 R6.2 ; RT1.2 -24,-27.55 v1(-23,-27.55) ; R3.1 v1(-20.25,3.75) ; L2.2 -15,-4.777 v1(-15,-5.75) ; v1(-12.75,-24.5) RT2.2 ; v1(-12.75,6) -12.2,5.45 -12.2,4.796 -12.154,4.75 U2.1 ; v1(-11.75,9.5) R5.2 C9.2 -10.369,7.719 -10.25,6.8 U2.48 ; D2.2 v1(-6.25,16) ; v1(-7,-11) -7,-10.15 R29.2 ; U2.24 -4.75,-2.8 -4.631,-3.719 C6.2 C5.2 v1(-3.25,-5.5) ; U2.36 -2.7,4.75 -1.781,4.869 C7.2 -1.5,5.431 v1(-1.5,7.75) ; v1(12.5,6.75) 12.5,7.65 R1.2 ; v1(12.75,-24.5) RT3.2
  BOT04 w0.2: U4.11 -3.425,0 -4.719,-0.069 C26.1 -5.281,-0.069 v1(-6,0.5) -5.281,1.069 C22.2 -4.3,0.65 U4.12 ; v1(12.5,6.75) 12.5,0.5 13.75,-0.75 18.75,-0.75 v1(25.75,-7.75)
  other v1: 25.25,-8.25 26.25,-8.25 26.75,-7.75
VCP: C17.1 U3.2 | length 3.3
  TOP01 w0.2: U3.2 8.25,-6.75 9,-7.5 C17.1
VDDA: C8.2 C10.2 L2.1 U2.9 | length 7.1
  TOP01 w0.2: L2.1 -13.6,-4.623 C8.2 C10.2 -13.35,-1.5 -13.35,0.15 -12.75,0.75 U2.9
VIN: C3.2 C4.2 C17.2 C18.2 CN1.2 E2.1 Q1.5 Q1.6 Q1.7 Q1.8 Q2.5 Q2.6 Q2.7 Q2.8 R24.2 U1.7 U3.1 | length 12.6
  TOP01 w0.2: R24.2 -4.85,10 CN1.2
  TOP01 w0.25: U3.1 8.1,-7.25 C18.2 ; v1(9.75,-10) 9.75,-9.1 C18.2 ; C17.2 10.869,-7.781 10.131,-8.719 C18.2
  other v1: -10.5,-23.307 -9.5,-23.307 -8.5,-23.307 -7.5,-23.307 7.5,-23.307 8.5,-23.307 9.5,-23.307 10.5,-23.307 -11,-22.807 -10,-22.807 -9,-22.807 -8,-22.807 -7,-22.807 7,-22.807 8,-22.807 9,-22.807 10,-22.807 11,-22.807 -10.5,-22.307 -9.5,-22.307 -8.5,-22.307 -7.5,-22.307 7.5,-22.307 8.5,-22.307 9.5,-22.307 10.5,-22.307 -11,-21.807 -10,-21.807 -9,-21.807 -8,-21.807 -7,-21.807 7,-21.807 8,-21.807 9,-21.807 10,-21.807 11,-21.807 -10.5,-21.307 -9.5,-21.307 -8.5,-21.307 -7.5,-21.307 7.5,-21.307 8.5,-21.307 9.5,-21.307 10.5,-21.307 -11,-20.807 -10,-20.807 -9,-20.807 -8,-20.807 -7,-20.807 7,-20.807 8,-20.807 9,-20.807 10,-20.807 11,-20.807 -10.5,-20.307 -9.5,-20.307 -8.5,-20.307 -7.5,-20.307 7.5,-20.307 8.5,-20.307 9.5,-20.307 10.5,-20.307 16.75,-6.25 17.75,-6.25
VREF: R8.1 R9.1 U3.6 | length 4.6
  TOP01 w0.2: U3.6 9.6,-4.75 R9.1 R8.1
pads on no net: CN1.3 CN1.4 U1.2 U1.3 U1.5 U1.10 U1.11 U2.2 U2.3 U2.4 U2.21 U2.22 U2.27 U2.28 U2.32 U2.33 U2.38 U2.40 U2.41 U2.43 U2.45 U2.46 U4.6 U4.7 U4.8 U4.9 U4.10 U4.14

## Polygon pours and split planes (outlines as drawn)
SN on TOP01 "NONET_L-01_P-001" (solid, pour order 18): 4,11.25 4,6.75 4.5,6.25 8.5,6.25 9,5.75 9,3.5 8.5,3 7.75,3 6.75,4 2,4 1,5 1,11.25
VIN on TOP01 "NONET_L-01_P-001" (solid, pour order 17): -1,8.5 -1,11.75 -0.5,12.25 6.75,12.25 7.25,11.75 7.25,9.25 9,9.25 9,13.75 8,14.75 -3,14.75 -4,13.75 -4,8.5
SN on TOP01 "NONET_L-01_P-001" (solid, pour order 14): 15.75,1.25 15.75,1.75 17.75,1.75 17.75,4.25 14.25,4.25 14.25,1.75 15,1.75 15,1.25 15,-1.25 13.75,-1.25 13.75,-6.75 15.75,-6.75
SN on TOP01 "NONET_L-01_P-001" (solid, pour order 13): 26.25,14.5 26.25,18.5 23.75,18.5 23.75,14.5
SN on TOP01 "NONET_L-01_P-001" (solid, pour order 12): 23.25,-8.75 23.25,-3.25 19,-3.25 19,-6.25 21.5,-8.75
SN on TOP01 "NONET_L-01_P-001" (solid, pour order 9): -13.25,5.25 -13.25,3 -10.5,3 -10.5,2 -13.25,2 -13.25,-1.25 -19.5,-1.25 -19.5,5.25
VBAT on TOP01 "NONET_L-01_P-001" (solid, pour order 8): 21.5,0.25 23.75,0.25 23.75,-7.75 23.75,-8.75 28,-8.75 28,3.5 21.5,3.5
VIN on TOP01 "NONET_L-01_P-001" (solid, pour order 5): 16.25,1.25 16.25,-6.75 18.25,-6.75 18.25,-1.25 17,-1.25 17,1.25
NetC1_1 on TOP01 "NONET_L-01_P-001" (solid, pour order 4): 17.5,-0.75 19.75,-0.75 19.75,6.5 25.95,6.5 26.25,6.8 26.25,12.25 23,12.25 19,8.25 18.5,8.25 18.5,7.25 18.75,7 18.75,2.25 17.5,1
SN on TOP01 "NONET_L-01_P-001" (solid, pour order 3): 3.5,-9.5 3.5,-12.5 -2.5,-12.5 -2.5,-9.5
SP on TOP01 "NONET_L-01_P-001" (solid, pour order 2): -4,-20.5 -0.75,-20.5 -0.75,-18.5 2,-18.5 2,-20.5 5.25,-20.5 5.25,-15.5 -4,-15.5
SH2 on TOP01 "NONET_L-01_P-001" (solid, pour order 1): 0.5,-21 0.5,-31.5 10,-31.5 10,-24.5 5.5,-24.5 5.5,-21
SH1 on TOP01 "NONET_L-01_P-001" (solid, pour order 0): -0.5,-21 -0.5,-31.5 -11.5,-31.5 -11.5,-24.5 -8,-24.5 -8,-26.5 -5.5,-26.5 -5.5,-21
SN on GND02 "NONET_L-01_P-001" (solid, remove dead copper, pour order 11): -29,-32 -29,15 cw(c-21,15) -21,23 21,23 cw(c21,15) 29,15 29,-32
VBAT on PWR03 "NONET_L-01_P-001" (solid, remove dead copper, pour order 10): -29,-32 -29,15 cw(c-21,15) -21,23 21,23 cw(c21,15) 29,15 29,-32
SN on BOT04 "NONET_L-01_P-001" (solid, pour order 20): 6.75,-4 6.25,-4.5 3.75,-4.5 3.5,-4.75 3.5,-9 3,-9.5 -2.5,-9.5 -2.5,-12.5 7.25,-12.5 8.25,-11.5 8.25,10.5 7.35,11.4 1.4,11.4 0.9,10.9 1,8.5 6.25,8.5 6.75,8
VIN on BOT04 "NONET_L-01_P-001" (solid, pour order 19): -11.5,-24 11.5,-24 11.5,-19 11.25,-18.75 11.25,-4 11.75,-3.5 15.75,-3.5 16.25,-4 16.25,-6.25 16.75,-6.75 17.75,-6.75 18.25,-6.25 18.25,-3 17.75,-2.5 11.75,-2.5 11.25,-2 11.25,13.75 10.25,14.75 -3,14.75 -4,13.75 -4,8.5 -1,8.5 -1,11.75 -0.5,12.25 8.25,12.25 8.75,11.75 8.75,-17 5.5,-20.25 -5.5,-20.25 -7,-18.75 -11,-18.75 -11.5,-19.25
VIN on Bottom Solder "NONET_L-01_P-001" (solid, pour order 15): -11.5,-24 11.5,-24 11.5,-19 11.25,-18.75 11.25,-4 11.75,-3.5 15.75,-3.5 16.25,-4 16.25,-6.25 16.75,-6.75 17.75,-6.75 18.25,-6.25 18.25,-3 17.75,-2.5 11.75,-2.5 11.25,-2 11.25,13.75 10.25,14.75 -3,14.75 -4,13.75 -4,8.5 -1,8.5 -1,11.75 -0.5,12.25 8.25,12.25 8.75,11.75 8.75,-17 5.5,-20.25 -5.5,-20.25 -7,-18.75 -11,-18.75 -11.5,-19.25
SN on Bottom Solder "NONET_L-01_P-001" (solid, pour order 16): 6.75,-4 6.25,-4.5 3.75,-4.5 3.5,-4.75 3.5,-9 3,-9.5 -2.5,-9.5 -2.5,-12.5 7.25,-12.5 8.25,-11.5 8.25,10.5 7.35,11.4 1.4,11.4 0.9,10.9 1,8.5 6.25,8.5 6.75,8

## Other copper
TOP01:
  pour cut-out: -17.5,-17 cw(c-17.5,-12) -22.5,-12 cw(c-17.5,-12) -17.5,-7 cw(c-17.5,-12) -12.5,-12 cw(c-17.5,-12)
  pour cut-out: 17.5,-17 cw(c17.5,-12) 12.5,-12 cw(c17.5,-12) 17.5,-7 cw(c17.5,-12) 22.5,-12 cw(c17.5,-12)
  pour cut-out: 17.5,9 cw(c17.5,14) 12.5,14 cw(c17.5,14) 17.5,19 cw(c17.5,14) 22.5,14 cw(c17.5,14)
  pour cut-out: -17.5,9 cw(c-17.5,14) -22.5,14 cw(c-17.5,14) -17.5,19 cw(c-17.5,14) -12.5,14 cw(c-17.5,14)
GND02:
  pour cut-out: -17.5,-17 cw(c-17.5,-12) -22.5,-12 cw(c-17.5,-12) -17.5,-7 cw(c-17.5,-12) -12.5,-12 cw(c-17.5,-12)
  pour cut-out: 17.5,-17 cw(c17.5,-12) 12.5,-12 cw(c17.5,-12) 17.5,-7 cw(c17.5,-12) 22.5,-12 cw(c17.5,-12)
  pour cut-out: 17.5,9 cw(c17.5,14) 12.5,14 cw(c17.5,14) 17.5,19 cw(c17.5,14) 22.5,14 cw(c17.5,14)
  pour cut-out: -17.5,9 cw(c-17.5,14) -22.5,14 cw(c-17.5,14) -17.5,19 cw(c-17.5,14) -12.5,14 cw(c-17.5,14)
PWR03:
  pour cut-out: 11.75,6.75 ccw(c12.5,6.75) 12.5,6 ccw(c12.5,6.75) 13.25,6.75 ccw(c12.5,6.75) 12.5,7.5 ccw(c12.5,6.75)
  pour cut-out: -17.5,-17 cw(c-17.5,-12) -22.5,-12 cw(c-17.5,-12) -17.5,-7 cw(c-17.5,-12) -12.5,-12 cw(c-17.5,-12)
  pour cut-out: 17.5,-17 cw(c17.5,-12) 12.5,-12 cw(c17.5,-12) 17.5,-7 cw(c17.5,-12) 22.5,-12 cw(c17.5,-12)
  pour cut-out: 17.5,9 cw(c17.5,14) 12.5,14 cw(c17.5,14) 17.5,19 cw(c17.5,14) 22.5,14 cw(c17.5,14)
  pour cut-out: -17.5,9 cw(c-17.5,14) -22.5,14 cw(c-17.5,14) -17.5,19 cw(c-17.5,14) -12.5,14 cw(c-17.5,14)
BOT04:
  pour cut-out: -17.5,-17 cw(c-17.5,-12) -22.5,-12 cw(c-17.5,-12) -17.5,-7 cw(c-17.5,-12) -12.5,-12 cw(c-17.5,-12)
  pour cut-out: 17.5,-17 cw(c17.5,-12) 12.5,-12 cw(c17.5,-12) 17.5,-7 cw(c17.5,-12) 22.5,-12 cw(c17.5,-12)
  pour cut-out: 17.5,9 cw(c17.5,14) 12.5,14 cw(c17.5,14) 17.5,19 cw(c17.5,14) 22.5,14 cw(c17.5,14)
  pour cut-out: -17.5,9 cw(c-17.5,14) -22.5,14 cw(c-17.5,14) -17.5,19 cw(c-17.5,14) -12.5,14 cw(c-17.5,14)

## Silkscreen, mask and mechanical layers (free items; w line width, h text height)
Top Overlay:
  drawing of 2077 lines, arcs and shapes, not listed
Mechanical 1:
  circle w0.013: c17.5,-12 r2.1
  circle w0.013: c-17.5,-12 r2.1
  circle w0.013: c-17.5,14 r2.1
  circle w0.013: c17.5,14 r2.1
  lines w0.1: -29,-32 -29,15 cw(c-21,15) -21,23 21,23 cw(c21,15) 29,15 29,-32 -29,-32

## Text inside footprints (layer, text, board x,y; h text height)
J1: Top Overlay "-" at 4.572,-27.044 h0.76; Bottom Overlay "-" at 5.08,-27.044 h0.76; Bottom Overlay "+" at -4.88,-31.775 h0.51